# Altium PCB PCB_BDD.PcbDoc (part 1 of 2)
Units mm, origin at the board's own origin, x right, y up, seen from the top; angles counter-clockwise.
Board outline 40 x 35 mm, 2 copper layers (Top Layer, Bottom Layer); 30 components, 19 nets, 78 pads, 51 vias.
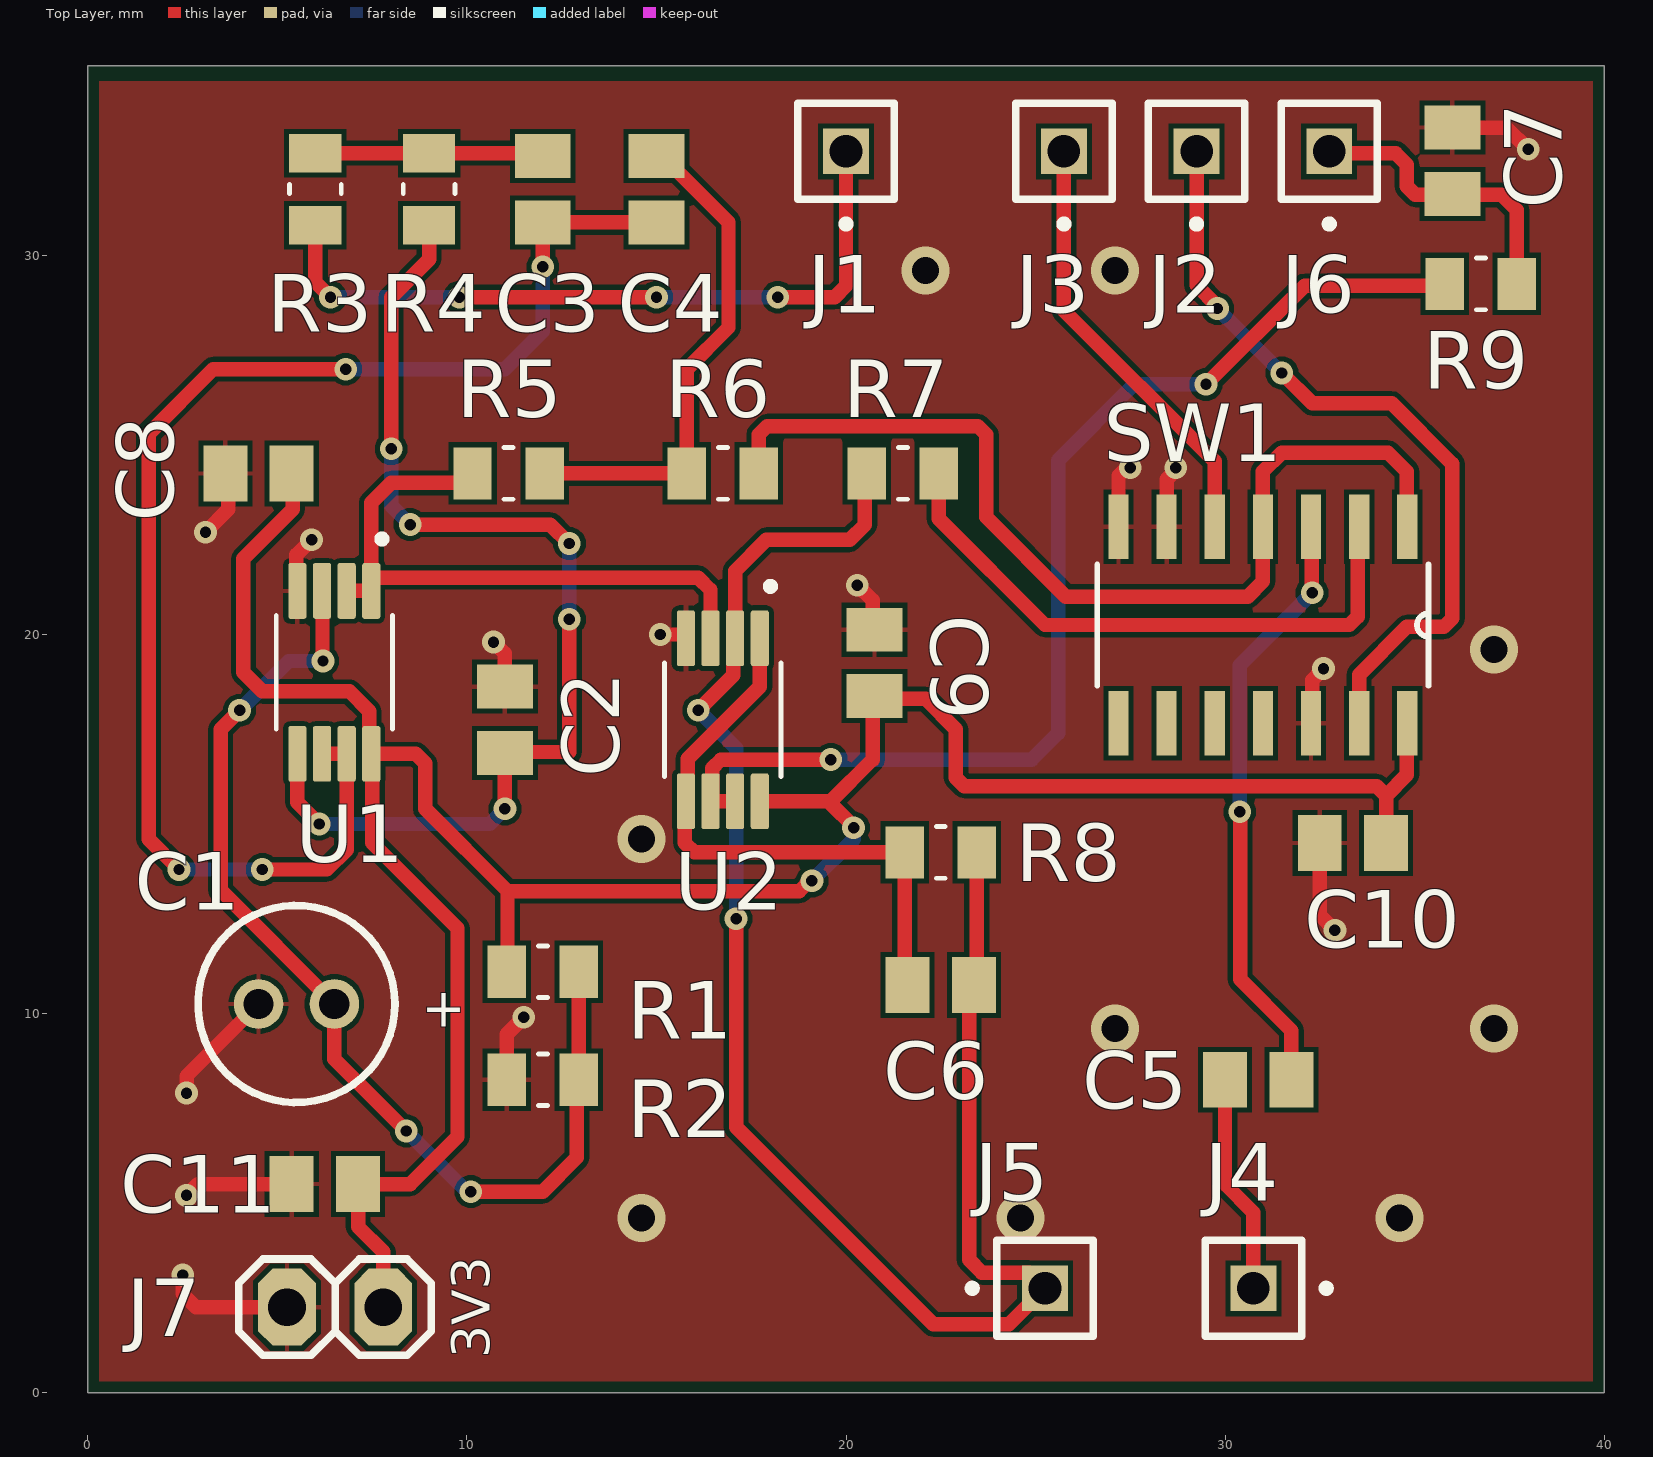
[diagram p0: Top Layer view]
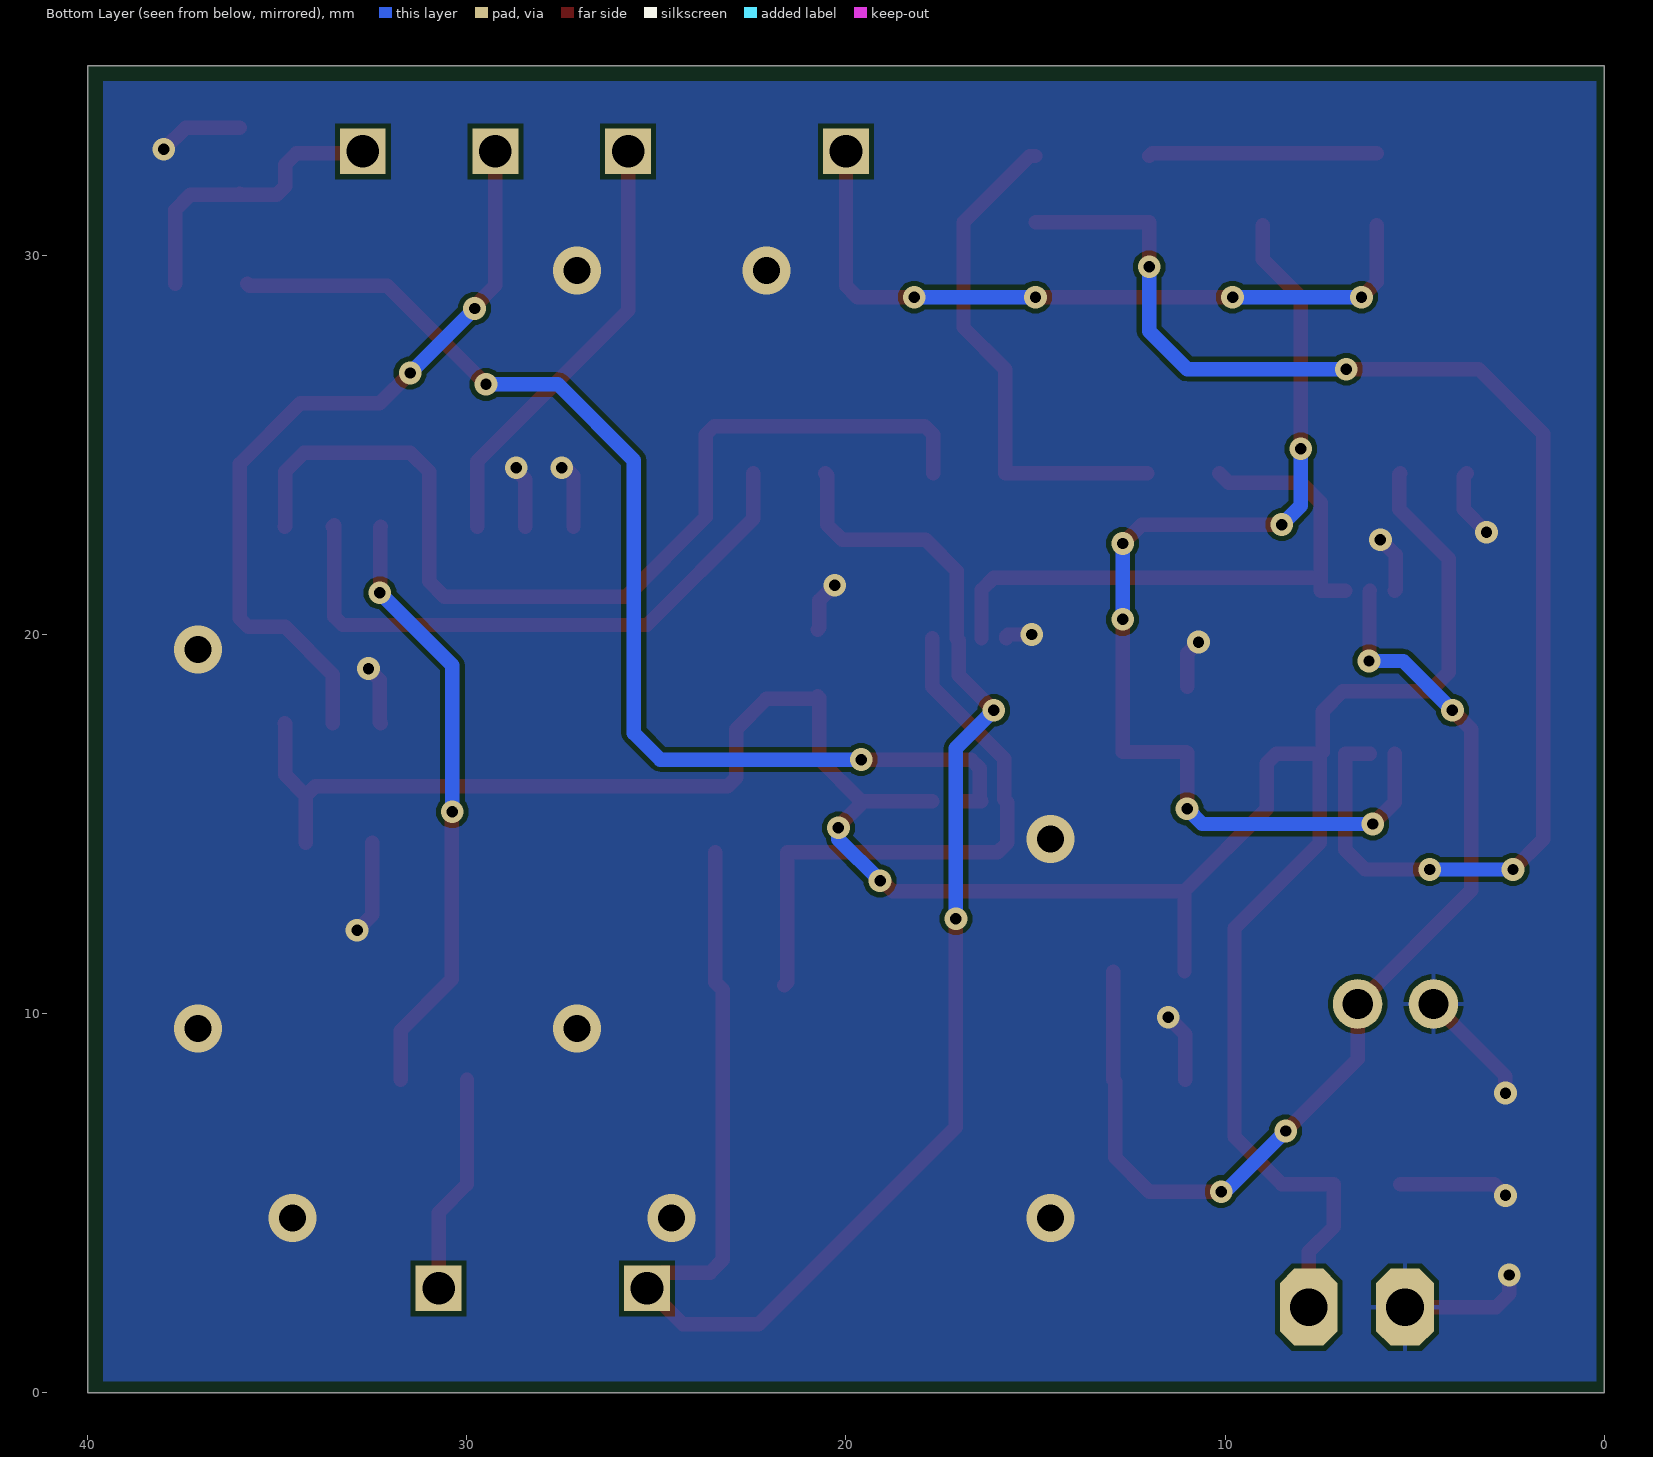
[diagram p1: Bottom Layer view, seen from below]
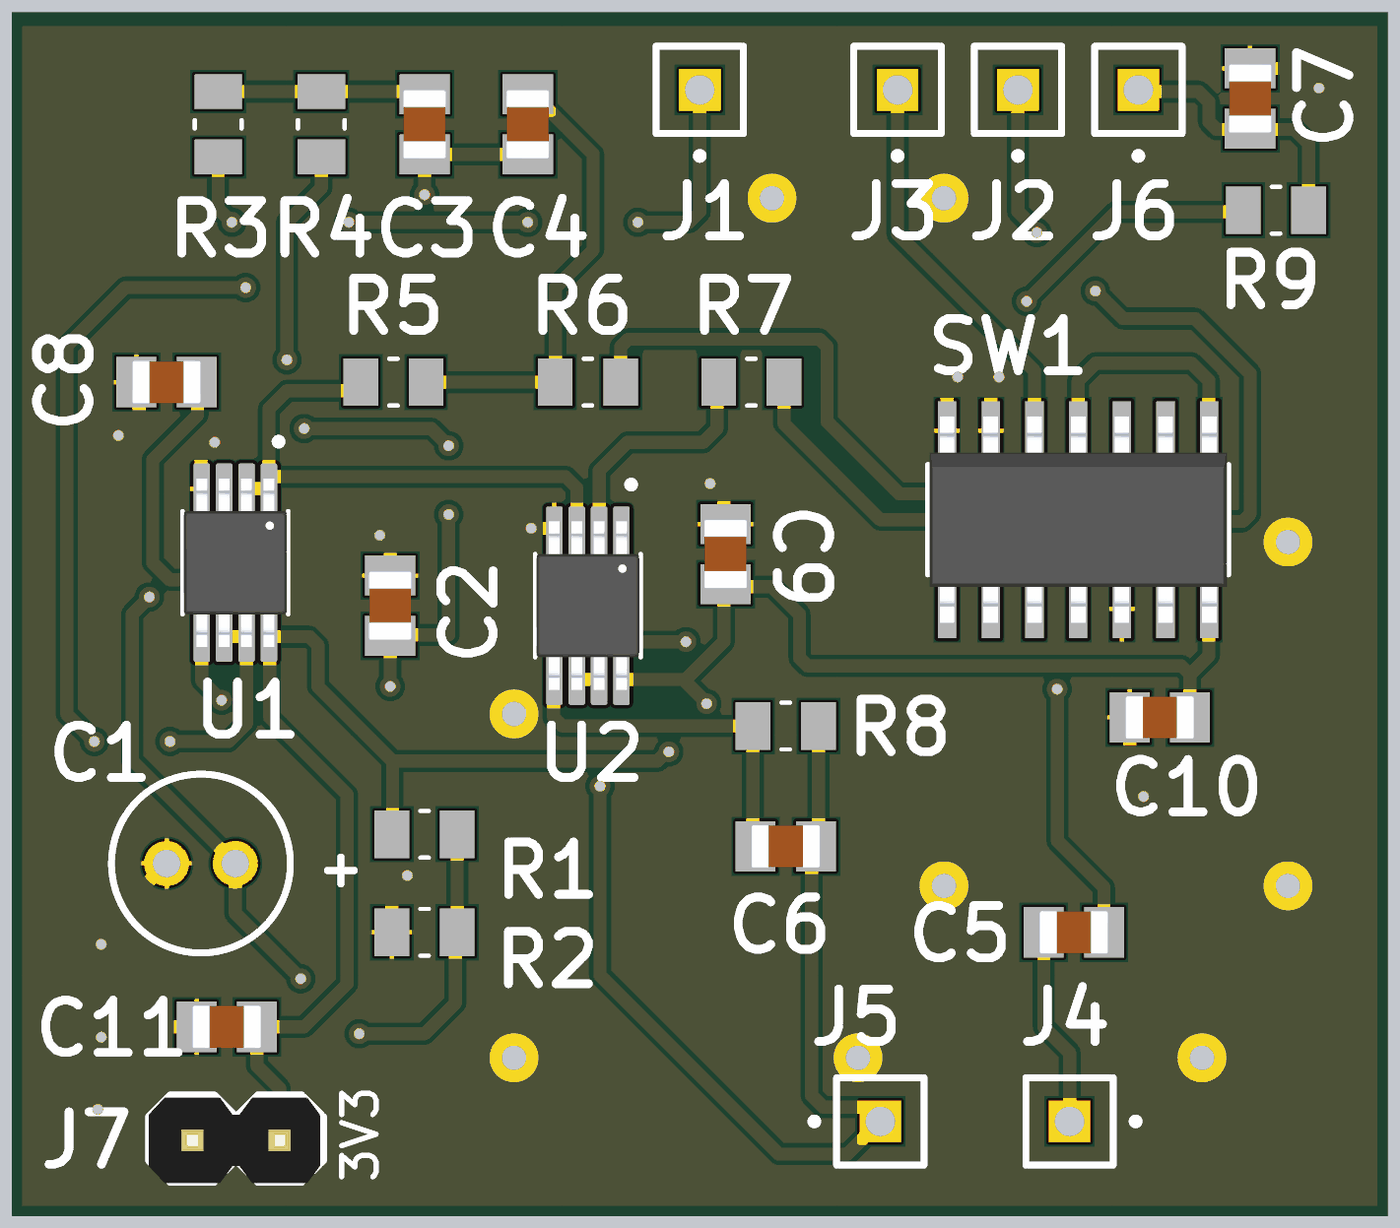
[diagram p2: 3D render of the assembled board from above, using the file's embedded part models]

## Layer stack, top to bottom
Top Solder: solder mask 0.0102, Solder Resist, Dk 3.5
Top Layer: signal copper 0.0356
Dielectric 1: dielectric 0.32, FR-4, Dk 4.8
Bottom Layer: signal copper 0.0356
Bottom Solder: solder mask 0.0102, Solder Resist, Dk 3.5

## Board outline
0,0 0,35 40,35 40,0

## Design rules (kind name [scope] priority, off if disabled: settings)
BoardOutlineClearance [All] p1: gap=0.2 ignorepadtopadclearanceinfootprint=FALSE
Clearance [All] p1: gap=0.127 ignorepadtopadclearanceinfootprint=FALSE except(0.25: Arc-Hole Track-Hole SMDPad-Hole THPad-Hole Via-Hole Fill-Hole Poly-Hole Region-Hole Text-Hole)
ComponentClearance [All] p1: gap=0.127 collisioncheckmode=3 verticalgap=0.127 showdistances=TRUE
DiffPairsRouting [All] p1: maxlimit=0.254 minlimit=0.127 mostfreqgap=0.127 toplayer_minwidth=0.127 toplayer_maxwidth=25.4 toplayer_prefwidth=0.127 bottomlayer_minwidth=0.127 bottomlayer_maxwidth=25.4 bottomlayer_prefwidth=0.127 maxuncoupledlength=12.7
Height [All] p1: minheight=0 maxheight=1816.048 prefheight=12.7
HoleSize [All] p1: absolutevalues=TRUE maxlimit=6.3 minlimit=0.3 maxpercent=80.000 minpercent=20.000
HoleToHoleClearance [All] p1: gap=0.25 allowstackedmicrovias=FALSE
MinimumAnnularRing [All] p1: minimumring=0.076
MinimumSolderMaskSliver [All] p1: minsoldermaskwidth=0
PlaneClearance [All] p1: clearance=0.127
PlaneConnect PlaneConnectPowerPads [InPadClass('PowerPads')] p1: planeconnectstyle=Direct reliefexpansion=0.508 reliefentries=4 reliefconductorwidth=0.254 reliefairgap=0.254
PlaneConnect [All] p2: pad.planeconnectstyle=Relief pad.reliefexpansion=0.3 pad.reliefentries=4 pad.reliefconductorwidth=0.127 pad.reliefairgap=0.127 via.planeconnectstyle=Direct via.reliefexpansion=0.3 via.reliefentries=4 via.reliefconductorwidth=0.127 via.reliefairgap=0.127
PolygonConnect PolygonConnectPowerPads [All vs (InPadClass('PowerPads'))] p1: connectstyle=Direct reliefconductorwidth=0.254 reliefentries=4 polygonreliefangle="90 Angle" airgapwidth=0.254
PolygonConnect [All] p2: thpad.connectstyle=Relief thpad.reliefconductorwidth=0.127 thpad.reliefentries=4 thpad.polygonreliefangle="90 Angle" thpad.airgapwidth=0.127 smdpad.connectstyle=Relief smdpad.reliefconductorwidth=0.127 smdpad.reliefentries=4 smdpad.polygonreliefangle="90 Angle" smdpad.airgapwidth=0.127 via.connectstyle=Direct via.reliefconductorwidth=0.127 via.reliefentries=4 via.polygonreliefangle="90 Angle" via.airgapwidth=0.127
RoutingVias [All] p1: holewidth=0.3 width=0.6 viastyle="Through Hole" minholewidth=0.3 minwidth=0.6 maxholewidth=0.6 maxwidth=6.6
SilkToSilkClearance [All] p1: silktosilkclearance=0
SilkToSolderMaskClearance [IsPad] p1: minsilkscreentomaskgap=0.127 clearancetoexposedcopper=TRUE
SolderMaskExpansion [All] p1: expansion=0.075 istentingtop=FALSE
Width [All] p1: maxlimit=25.4 minlimit=0.127 preferedwidth=0.127 minimp=50.000000 maximp=50.000000 favimp=50.000000
20 further rules are at their usual default settings.

## Components (designator, comment, footprint, x,y, rotation, side; value= is the part's Value field where it differs from the comment)
C1 "1uF" WCAP-ATG5_5X11(DXL) 5.5,10.25 r0 top value=1µF
C2 "1nF" CAPC2012X140N 11,17.75 r270 top
C3 "2.2nF" CAPC2012X88N 12,31.75 r90 top
C4 "0.47uF" CAPC2012X140N 15,31.75 r90 top value=470nF
C5 "1uF" CAPC2012X140N 30.875,8.25 r180 top
C6 "470pF" CAPC2012X88N 22.5,10.75 r180 top
C7 "470pF" CAPC2012X88N 36,32.5 r270 top
C8 "100nF" CAPC2012X140N 4.5,24.25 r0 top
C9 "100nF" CAPC2012X140N 20.75,19.25 r270 top
C10 "100nF" CAPC2012X140N 33.375,14.5 r180 top
C11 "10uF" CAPC2012X140N 6.25,5.5 r0 top value=10µF
J1 "GPIO25_DAC" SAMTEC_SLW-101-01-T-S 20,32.75 r270 top
J2 "GPIO16" SAMTEC_SLW-101-01-T-S 29.25,32.75 r270 top
J3 "GPIO17" SAMTEC_SLW-101-01-T-S 25.75,32.75 r270 top
J4 "ELECTRODE" SAMTEC_SLW-101-01-T-S 30.75,2.75 r0 top
J5 "ELECTRODE" SAMTEC_SLW-101-01-T-S 25.25,2.75 r180 top
J6 "ESP32_ADC1" SAMTEC_SLW-101-01-T-S 32.75,32.75 r270 top
J7 "PPPC021LFBN-RC" My_1X02 7.79,2.25 r0 top
R1 "100K" RESC2012X65N 12,11.1 r180 top value=10kΩ
R2 "100K" RESC2012X65N 12,8.25 r0 top value=10kΩ
R3 "10K" RESC2012X65N 6,31.75 r270 top value=10kΩ
R4 "10K" RESC2012X65N 9,31.75 r90 top value=10kΩ
R5 "100K" RESC2012X65N 11.098,24.25 r0 top value=10kΩ
R6 "100K" RESC2012X65N 16.75,24.25 r180 top value=10kΩ
R7 "10K" RESC2012X65N 21.5,24.25 r180 top
R8 "100K" RESC2012X65N 22.5,14.25 r180 top
R9 "150R" RESC2012X65N 36.75,29.25 r0 top
SW1 "74HC4066D-Q100,118" SOIC127P600X175-14N 31,20.25 r270 top
U1 "OPA2333AIDGKR" SOP65P490X110-8N 6.5,19 r270 top
U2 "OPA2333AIDGKR" SOP65P490X110-8N 16.75,17.75 r270 top

## Footprints (in the part's own frame and the unit in brackets; to place one, negate y for a bottom-side part, rotate by r counter-clockwise, add the part's x,y. Pads: shape width x height; smd on the part's side, far side on the other; paste and mask are expansions set on the pad)
CAPC2012X88N [mm]
  rect 1.16x1.47 smd: 1(-0.875,0) 2(0.875,0)
  body extent -1,-0.63 1,0.63, height 0.88
CAPC2012X140N [mm]
  rect 1.16x1.47 smd: 1(-0.875,0) 2(0.875,0)
  body extent -1,-0.63 1,0.63, height 0.88
My_1X02 [mil]
  oct 60x80 hole 39.37: 1(-100,0) 2(0,0)
  silkscreen extent -150,-50 50,50, body extent -150,-51 46,47, height 323
RESC2012X65N [mm]
  rect 1.01x1.38 smd: 1(-0.95,0) 2(0.95,0)
  silkscreen extent -0.12,-0.68 0.12,0.68
SAMTEC_SLW-101-01-T-S [mm]
  rect 1.21x1.21 hole 0.86: 01(0,0)
  silkscreen extent -1.27,-1.27 2.02,1.27
SOIC127P600X175-14N [mil]
  rect 67x21 smd paste+0 mask+4.02: 1(-102,150) 2(-102,100) 3(-102,50) 4(-102,0) 5(-102,-50) 6(-102,-100) 7(-102,-150) 8(102,-150) 9(102,-100) 10(102,-50) 11(102,0) 12(102,50) 13(102,100) 14(102,150)
  silkscreen extent -63,-172 63,172, body extent -118,-170 118,170, height 69
SOP65P490X110-8N [mm]
  rrect25% 1.47x0.48 smd paste+0 mask+0.102: 1(-2.15,0.975) 2(-2.15,0.325) 3(-2.15,-0.325) 4(-2.15,-0.975) 5(2.15,-0.975) 6(2.15,-0.325) 7(2.15,0.325) 8(2.15,0.975)
  silkscreen extent -3.62,-1.54 1.5,1.53, body extent -2.45,-1.5 2.45,1.5, height 1.1
WCAP-ATG5_5X11(DXL) [mm]
  round 1.308 hole 0.8: 1(1,0) 2(-1,0)
  silkscreen extent -2.6,-2.6 2.6,2.6

## Part data
C1: library part 860020672005, "CAP ALUM 1UF 20% 50V RADIAL TH", Case/Package=Radial, ESR (Equivalent Series Resistance)=39.553Ω, Leakage Current=3µA, Manufacturer="Wurth Elektronik", Manufacturer Lifecycle Status=ACTIVE, Max Operating Temperature=105°C, Min Operating Temperature=-40°C, Ripple Current=13mA, Supplier Part Number=732-8851-3-ND, Tolerance=20%, Voltage Rating=50V, Category="Aluminum Electrolytic Capacitors", ComponentLink1Description=https://datasheet.octopart.com:443/860020672005-Wurth-Elektronik-datasheet-159617218.pdf?src-supplier=Wurth+Elektronik, ComponentLink1URL=https://datasheet.octopart.com:443/860020672005-Wurth-Elektronik-datasheet-159617218.pdf?src-supplier=Wurth+Elektronik, ComponentLink2Description=https://datasheet.octopart.com:443/860020672005-W%C3%BCrth-Elektronik-datasheet-37143900.pdf?src-supplier=RS+(Formerly+Allied+Electronics), ComponentLink2URL=https://datasheet.octopart.com:443/860020672005-W%C3%BCrth-Elektronik-datasheet-37143900.pdf?src-supplier=RS+(Formerly+Allied+Electronics), Diameter=5mm, Height=11mm, Height - Seated (Max)=12.4968mm, Hole Diameter=800µm, Lead Pitch=2.0066mm, Length=11mm, Life (Hours)=2000hours, Lifecycle Status=Production, Manufacturer Part Number=860020672005, Mounting Technology="Through Hole", Packaging="Tape & Box (TB)", Pitch=2mm, Polarity=Polar, Pricing="2000=0.0551 (USD)", REACH SVHC=Unknown, RoHS=Compliant, Stock=70000, Supplier=DigiKey, Voltage Rating (DC)=50V, YEOL="1 = Estimated lifetime > 10 years"
C2: library part C0805C102K5RACTU, "CAP CER 1000PF 50V X7R 0805", Case Code (Imperial)=0805, Dielectric=X7R, Dielectric Material=Ceramic, Manufacturer="Yageo Group", Max Operating Temperature=125°C, Min Operating Temperature=-55°C, Supplier Part Number=399-C0805C102K5RACTUCT-ND, Temperature Coefficient=30ppm/°C, Tolerance=10%, Voltage=50V, Case/Package=0805, Category="Ceramic Capacitors", China RoHS=Compliant, ComponentLink1Description=https://datasheet.octopart.com:443/C0805C102K5RAC7800-KEMET-datasheet-179100141.pdf?src-supplier=IHS, ComponentLink1URL=https://datasheet.octopart.com:443/C0805C102K5RAC7800-KEMET-datasheet-179100141.pdf?src-supplier=IHS, ComponentLink2Description=https://datasheet.octopart.com:443/C0805C102K5RACTU-KEMET-datasheet-178445679.pdf?src-supplier=IHS, ComponentLink2URL=https://datasheet.octopart.com:443/C0805C102K5RACTU-KEMET-datasheet-178445679.pdf?src-supplier=IHS, ComponentLink3Description=https://datasheet.octopart.com:443/C0805C102K5RACTU-KEMET-datasheet-137357759.pdf?src-supplier=Farnell, ComponentLink3URL=https://datasheet.octopart.com:443/C0805C102K5RACTU-KEMET-datasheet-137357759.pdf?src-supplier=Farnell, ComponentLink4Description=https://datasheet.octopart.com:443/C0805C102K5RACTU-KEMET-datasheet-32036385.pdf?src-supplier=Farnell, ComponentLink4URL=https://datasheet.octopart.com:443/C0805C102K5RACTU-KEMET-datasheet-32036385.pdf?src-supplier=Farnell, ComponentLink5Description=https://datasheet.octopart.com:443/C0805C102K5RACTU-Kemet-datasheet-12608295.pdf?src-supplier=Farnell, ComponentLink5URL=https://datasheet.octopart.com:443/C0805C102K5RACTU-Kemet-datasheet-12608295.pdf?src-supplier=Farnell, ComponentLink6Description=https://datasheet.octopart.com:443/C0805C102K5RACTU-Kemet-datasheet-11992184.pdf?src-supplier=Farnell, ComponentLink6URL=https://datasheet.octopart.com:443/C0805C102K5RACTU-Kemet-datasheet-11992184.pdf?src-supplier=Farnell, ComponentLink7Description=https://datasheet.octopart.com:443/C0805C102K5RACTU-Kemet-datasheet-10942409.pdf?src-supplier=Farnell, ComponentLink7URL=https://datasheet.octopart.com:443/C0805C102K5RACTU-Kemet-datasheet-10942409.pdf?src-supplier=Farnell, ComponentLink8Description=https://datasheet.octopart.com:443/C0805C102K5RACTU-Kemet-datasheet-10404442.pdf?src-supplier=Farnell, ComponentLink8URL=https://datasheet.octopart.com:443/C0805C102K5RACTU-Kemet-datasheet-10404442.pdf?src-supplier=Farnell, ComponentLink9Description=https://datasheet.octopart.com:443/C0805C102K5RACTU-KEMET-datasheet-101576065.pdf?src-supplier=Farnell, ComponentLink9URL=https://datasheet.octopart.com:443/C0805C102K5RACTU-KEMET-datasheet-101576065.pdf?src-supplier=Farnell, ComponentLink10Description=https://datasheet.octopart.com:443/C0805C102K5RACTU.-Kemet-datasheet-41232427.pdf?src-supplier=Farnell, ComponentLink10URL=https://datasheet.octopart.com:443/C0805C102K5RACTU.-Kemet-datasheet-41232427.pdf?src-supplier=Farnell, ComponentLink11Description=https://datasheet.octopart.com:443/C0805C102K5RACTU-KEMET-datasheet-176142286.pdf?src-supplier=Farnell, ComponentLink11URL=https://datasheet.octopart.com:443/C0805C102K5RACTU-KEMET-datasheet-176142286.pdf?src-supplier=Farnell, ComponentLink12Description=https://datasheet.octopart.com:443/C0805C102K5RAC-TU-Kemet-datasheet-7833651.pdf?src-supplier=Farnell, ComponentLink12URL=https://datasheet.octopart.com:443/C0805C102K5RAC-TU-Kemet-datasheet-7833651.pdf?src-supplier=Farnell, ComponentLink13Description=https://datasheet.octopart.com:443/C0805C102K5RAC-TU-Kemet-datasheet-7601896.pdf?src-supplier=Farnell, ComponentLink13URL=https://datasheet.octopart.com:443/C0805C102K5RAC-TU-Kemet-datasheet-7601896.pdf?src-supplier=Farnell, ComponentLink14Description=https://datasheet.octopart.com:443/C0805C102K5RAC-TU-Kemet-datasheet-5316294.pdf?src-supplier=Farnell, ComponentLink14URL=https://datasheet.octopart.com:443/C0805C102K5RAC-TU-Kemet-datasheet-5316294.pdf?src-supplier=Farnell, ComponentLink15Description=https://datasheet.octopart.com:443/C0805C102K5RAC-TU-Kemet-datasheet-5314837.pdf?src-supplier=Farnell, ComponentLink15URL=https://datasheet.octopart.com:443/C0805C102K5RAC-TU-Kemet-datasheet-5314837.pdf?src-supplier=Farnell, ComponentLink16Description=https://datasheet.octopart.com:443/C0805C102K5RAC-TU-Kemet-datasheet-8092359.pdf?src-supplier=Farnell, ComponentLink16URL=https://datasheet.octopart.com:443/C0805C102K5RAC-TU-Kemet-datasheet-8092359.pdf?src-supplier=Farnell, ComponentLink17Description=https://datasheet.octopart.com:443/C0805C102K5RACTU-Kemet-datasheet-5314449.pdf?src-supplier=Farnell, ComponentLink17URL=https://datasheet.octopart.com:443/C0805C102K5RACTU-Kemet-datasheet-5314449.pdf?src-supplier=Farnell, ComponentLink18Description=https://datasheet.octopart.com:443/C0805C102K5RAC-TU-Kemet-datasheet-5314969.pdf?src-supplier=Farnell, ComponentLink18URL=https://datasheet.octopart.com:443/C0805C102K5RAC-TU-Kemet-datasheet-5314969.pdf?src-supplier=Farnell, ComponentLink19Description=https://datasheet.octopart.com:443/C0805C102K5RAC-TU-Kemet-datasheet-5314627.pdf?src-supplier=Farnell, ComponentLink19URL=https://datasheet.octopart.com:443/C0805C102K5RAC-TU-Kemet-datasheet-5314627.pdf?src-supplier=Farnell, ComponentLink20Description=https://datasheet.octopart.com:443/C0805C102K5RAC-TU-Kemet-datasheet-5389132.pdf?src-supplier=Farnell, ComponentLink20URL=https://datasheet.octopart.com:443/C0805C102K5RAC-TU-Kemet-datasheet-5389132.pdf?src-supplier=Farnell, ComponentLink21Description=https://datasheet.octopart.com:443/C0805C102K5RAC-TU-Kemet-datasheet-5313836.pdf?src-supplier=Farnell, ComponentLink21URL=https://datasheet.octopart.com:443/C0805C102K5RAC-TU-Kemet-datasheet-5313836.pdf?src-supplier=Farnell, ComponentLink22Description=https://datasheet.octopart.com:443/C0805C102K5RAC-TU-Kemet-datasheet-8111010.pdf?src-supplier=Farnell, ComponentLink22URL=https://datasheet.octopart.com:443/C0805C102K5RAC-TU-Kemet-datasheet-8111010.pdf?src-supplier=Farnell, ComponentLink23Description=https://datasheet.octopart.com:443/C0805C102K5RAC-TU-Kemet-datasheet-7627733.pdf?src-supplier=Farnell, ComponentLink23URL=https://datasheet.octopart.com:443/C0805C102K5RAC-TU-Kemet-datasheet-7627733.pdf?src-supplier=Farnell, ComponentLink24Description=https://datasheet.octopart.com:443/C0805C102K5RAC-TU-Kemet-datasheet-5315946.pdf?src-supplier=Farnell, ComponentLink24URL=https://datasheet.octopart.com:443/C0805C102K5RAC-TU-Kemet-datasheet-5315946.pdf?src-supplier=Farnell, ComponentLink25Description=https://datasheet.octopart.com:443/C0805C102K5RACTU-KEMET-datasheet-68331921.pdf?src-supplier=Upverter, ComponentLink25URL=https://datasheet.octopart.com:443/C0805C102K5RACTU-KEMET-datasheet-68331921.pdf?src-supplier=Upverter, ComponentLink26Description=https://datasheet.octopart.com:443/C0805C102K5RAC-TU-Kemet-datasheet-5313890.pdf?src-supplier=Newark, ComponentLink26URL=https://datasheet.octopart.com:443/C0805C102K5RAC-TU-Kemet-datasheet-5313890.pdf?src-supplier=Newark, ComponentLink27Description=https://datasheet.octopart.com:443/C0805C102K5RACTU-KEMET-datasheet-130256537.pdf?src-supplier=Newark, ComponentLink27URL=https://datasheet.octopart.com:443/C0805C102K5RACTU-KEMET-datasheet-130256537.pdf?src-supplier=Newark, ComponentLink28Description=https://datasheet.octopart.com:443/C0805C102K5RAC-TU-Kemet-datasheet-5390537.pdf?src-supplier=Newark, ComponentLink28URL=https://datasheet.octopart.com:443/C0805C102K5RAC-TU-Kemet-datasheet-5390537.pdf?src-supplier=Newark, ComponentLink29Description=https://datasheet.octopart.com:443/C0805C102K5RAC-TU-Kemet-datasheet-7541751.pdf?src-supplier=Newark, ComponentLink29URL=https://datasheet.octopart.com:443/C0805C102K5RAC-TU-Kemet-datasheet-7541751.pdf?src-supplier=Newark, ComponentLink30Description=https://datasheet.octopart.com:443/C0805C102K5RACTU-KEMET-datasheet-176289583.pdf?src-supplier=Newark, ComponentLink30URL=https://datasheet.octopart.com:443/C0805C102K5RACTU-KEMET-datasheet-176289583.pdf?src-supplier=Newark, ComponentLink31Description=https://datasheet.octopart.com:443/C0805C102K5RACTU-Kemet-datasheet-8764837.pdf?src-supplier=Newark, ComponentLink31URL=https://datasheet.octopart.com:443/C0805C102K5RACTU-Kemet-datasheet-8764837.pdf?src-supplier=Newark, ComponentLink32Description=https://datasheet.octopart.com:443/C0805C102K5RACTU-Kemet-datasheet-8480123.pdf?src-supplier=Newark, ComponentLink32URL=https://datasheet.octopart.com:443/C0805C102K5RACTU-Kemet-datasheet-8480123.pdf?src-supplier=Newark, ComponentLink33Description=https://datasheet.octopart.com:443/C0805C102K5RACTU-Kemet-datasheet-5393970.pdf?src-supplier=Newark, ComponentLink33URL=https://datasheet.octopart.com:443/C0805C102K5RACTU-Kemet-datasheet-5393970.pdf?src-supplier=Newark, ComponentLink34Description=https://datasheet.octopart.com:443/C0805C102K5RACTU-Kemet-datasheet-8502025.pdf?src-supplier=Newark, ComponentLink34URL=https://datasheet.octopart.com:443/C0805C102K5RACTU-Kemet-datasheet-8502025.pdf?src-supplier=Newark, ComponentLink35Description=https://datasheet.octopart.com:443/C0805C102K5RACTU-Kemet-datasheet-161801.pdf?src-supplier=Newark, ComponentLink35URL=https://datasheet.octopart.com:443/C0805C102K5RACTU-Kemet-datasheet-161801.pdf?src-supplier=Newark, ComponentLink36Description=https://datasheet.octopart.com:443/C0805C102K5RACTU-KEMET-datasheet-184787613.pdf?src-supplier=Newark, ComponentLink36URL=https://datasheet.octopart.com:443/C0805C102K5RACTU-KEMET-datasheet-184787613.pdf?src-supplier=Newark, ComponentLink37Description=https://datasheet.octopart.com:443/C0805C102K5RAC7800-KEMET-datasheet-37550250.pdf?src-supplier=Electro+Sonic, ComponentLink37URL=https://datasheet.octopart.com:443/C0805C102K5RAC7800-KEMET-datasheet-37550250.pdf?src-supplier=Electro+Sonic, ComponentLink38Description=https://datasheet.octopart.com:443/C0805C102K5RAC7800-KEMET-datasheet-188512054.pdf?src-supplier=ODG+(Origin+Data+Global), ComponentLink38URL=https://datasheet.octopart.com:443/C0805C102K5RAC7800-KEMET-datasheet-188512054.pdf?src-supplier=ODG+(Origin+Data+Global), ComponentLink39Description=https://datasheet.octopart.com:443/C0805C102K5RACTU-KEMET-datasheet-164512540.pdf?src-supplier=TME, ComponentLink39URL=https://datasheet.octopart.com:443/C0805C102K5RACTU-KEMET-datasheet-164512540.pdf?src-supplier=TME, ComponentLink40Description=https://datasheet.octopart.com:443/C0805C102K5RACTU-Kemet-datasheet-67847102.pdf?src-supplier=TME, ComponentLink40URL=https://datasheet.octopart.com:443/C0805C102K5RACTU-Kemet-datasheet-67847102.pdf?src-supplier=TME, ComponentLink41Description=https://datasheet.octopart.com:443/C0805C102K5RACTU-KEMET-datasheet-68331906.pdf?src-supplier=TME, ComponentLink41URL=https://datasheet.octopart.com:443/C0805C102K5RACTU-KEMET-datasheet-68331906.pdf?src-supplier=TME, ComponentLink42Description=https://datasheet.octopart.com:443/C0805C102K5RACTU-KEMET-datasheet-110724412.pdf?src-supplier=RS+(Formerly+Allied+Electronics), ComponentLink42URL=https://datasheet.octopart.com:443/C0805C102K5RACTU-KEMET-datasheet-110724412.pdf?src-supplier=RS+(Formerly+Allied+Electronics), ComponentLink43Description=https://datasheet.octopart.com:443/C0805C102K5RACTU-Kemet-datasheet-464.pdf?src-supplier=RS+(Formerly+Allied+Electronics), ComponentLink43URL=https://datasheet.octopart.com:443/C0805C102K5RACTU-Kemet-datasheet-464.pdf?src-supplier=RS+(Formerly+Allied+Electronics), ComponentLink44Description=https://datasheet.octopart.com/C0805C102K5RACTU-KEMET-datasheet-84169754.pdf, ComponentLink44URL=https://datasheet.octopart.com/C0805C102K5RACTU-KEMET-datasheet-84169754.pdf, ComponentLink45Description=https://datasheet.octopart.com:443/C0805C102K5RACTU-Kemet-datasheet-24570007.pdf?src-supplier=element14+APAC, ComponentLink45URL=https://datasheet.octopart.com:443/C0805C102K5RACTU-Kemet-datasheet-24570007.pdf?src-supplier=element14+APAC, ComponentLink46Description=https://datasheet.octopart.com:443/C0805C102K5RACTU-Kemet-datasheet-22084244.pdf?src-supplier=element14+APAC, ComponentLink46URL=https://datasheet.octopart.com:443/C0805C102K5RACTU-Kemet-datasheet-22084244.pdf?src-supplier=element14+APAC, ComponentLink47Description=https://datasheet.octopart.com:443/C0805C102K5RACTU-Kemet-datasheet-11791272.pdf?src-supplier=Arrow+Electronics, ComponentLink47URL=https://datasheet.octopart.com:443/C0805C102K5RACTU-Kemet-datasheet-11791272.pdf?src-supplier=Arrow+Electronics, ComponentLink48Description=https://datasheet.octopart.com:443/C0805C102K5RAC7800-Kemet-datasheet-11546808.pdf?src-supplier=Arrow+Electronics, ComponentLink48URL=https://datasheet.octopart.com:443/C0805C102K5RAC7800-Kemet-datasheet-11546808.pdf?src-supplier=Arrow+Electronics, ComponentLink49Description=https://datasheet.octopart.com:443/C0805C102K5RAC7800-KEMET-datasheet-164857143.pdf?src-supplier=Burklin+Elektronik, ComponentLink49URL=https://datasheet.octopart.com:443/C0805C102K5RAC7800-KEMET-datasheet-164857143.pdf?src-supplier=Burklin+Elektronik, ComponentLink50Description=https://datasheet.octopart.com:443/C0805C102K5RAC-TU-Kemet-datasheet-7272872.pdf?src-supplier=Jameco+(USA), ComponentLink50URL=https://datasheet.octopart.com:443/C0805C102K5RAC-TU-Kemet-datasheet-7272872.pdf?src-supplier=Jameco+(USA), ComponentLink51Description=http://sigma.octopart.com:80/conflict_mineral_statement/Yageo-company-3.pdf?src-supplier=Compliance+Statements, ComponentLink51URL=http://sigma.octopart.com:80/conflict_mineral_statement/Yageo-company-3.pdf?src-supplier=Compliance+Statements, ComponentLink52Description=http://sigma.octopart.com:80/rohs_statement/Yageo-company-2.pdf?src-supplier=Compliance+Statements, ComponentLink52URL=http://sigma.octopart.com:80/rohs_statement/Yageo-company-2.pdf?src-supplier=Compliance+Statements, Contact Plating=Tin, Country of Origin=Mexico, Depth=1.25mm, Export Control Classification Number (ECCN) Code=EAR99, Harmonized Tariff Schedule (HTS) Code=8532.24.00.20, Height=780µm, Introduction Date=2008-01-10, Lead Free="Lead Free", Lead Pitch=750µm, Length=2mm, Lifecycle Status=Production, Manufacturer Part Number=C0805C102K5RACTU, Material=Ceramic, Mounting Technology="Surface Mount", Number of Terminals=2, Packaging="Cut Tape", Pins=2, Pricing="1=0.16, 10=0.088, 50=0.0612, 100=0.0529, 500=0.03924 (USD)", Radiation Hardening=No, REACH SVHC=Unaffected, RoHS=Compliant, Schedule B="8532240020, 8532240020|8532240020, 8532240020|8532240020|8532240020, 8532240020|8532240020|8532240020|8532240020", Stock=586001, Supplier=DigiKey, Termination=SMD/SMT, Thickness=889µm, Voltage Rating=50V, Voltage Rating (DC)=50V, Width=1.25mm
C3: library part C0805C222K5RACTU, "CAP CER 2200PF 50V X7R 0805", Case Code (Imperial)=0805, Dielectric=X7R, Dielectric Material=Ceramic, Manufacturer="Yageo Group", Manufacturer Package Identifier="0805 (2012 metric)", Max Operating Temperature=125°C, Min Operating Temperature=-55°C, Supplier Part Number=399-C0805C222K5RACTUCT-ND, Temperature Coefficient=30ppm/°C, Tolerance=10%, Voltage=50V, Case/Package=0805, Category="Ceramic Capacitors", China RoHS=Compliant, ComponentLink1Description=https://datasheet.octopart.com:443/C0805C222K5RACTU-KEMET-datasheet-178445679.pdf?src-supplier=Farnell, ComponentLink1URL=https://datasheet.octopart.com:443/C0805C222K5RACTU-KEMET-datasheet-178445679.pdf?src-supplier=Farnell, ComponentLink2Description=https://datasheet.octopart.com:443/C0805C222K5RACTU-KEMET-datasheet-137357759.pdf?src-supplier=Farnell, ComponentLink2URL=https://datasheet.octopart.com:443/C0805C222K5RACTU-KEMET-datasheet-137357759.pdf?src-supplier=Farnell, ComponentLink3Description=https://datasheet.octopart.com:443/C0805C222K5RACTU-Kemet-datasheet-5313890.pdf?src-supplier=Farnell, ComponentLink3URL=https://datasheet.octopart.com:443/C0805C222K5RACTU-Kemet-datasheet-5313890.pdf?src-supplier=Farnell, ComponentLink4Description=https://datasheet.octopart.com:443/C0805C222K5RACTU-Kemet-datasheet-8764837.pdf?src-supplier=Farnell, ComponentLink4URL=https://datasheet.octopart.com:443/C0805C222K5RACTU-Kemet-datasheet-8764837.pdf?src-supplier=Farnell, ComponentLink5Description=https://datasheet.octopart.com:443/C0805C222K5RACTU-Kemet-datasheet-8480123.pdf?src-supplier=Farnell, ComponentLink5URL=https://datasheet.octopart.com:443/C0805C222K5RACTU-Kemet-datasheet-8480123.pdf?src-supplier=Farnell, ComponentLink6Description=https://datasheet.octopart.com:443/C0805C222K5RACTU-Kemet-datasheet-5390537.pdf?src-supplier=Farnell, ComponentLink6URL=https://datasheet.octopart.com:443/C0805C222K5RACTU-Kemet-datasheet-5390537.pdf?src-supplier=Farnell, ComponentLink7Description=https://datasheet.octopart.com:443/C0805C222K5RACTU-Kemet-datasheet-5393970.pdf?src-supplier=Farnell, ComponentLink7URL=https://datasheet.octopart.com:443/C0805C222K5RACTU-Kemet-datasheet-5393970.pdf?src-supplier=Farnell, ComponentLink8Description=https://datasheet.octopart.com:443/C0805C222K5RACTU-Kemet-datasheet-8502025.pdf?src-supplier=Farnell, ComponentLink8URL=https://datasheet.octopart.com:443/C0805C222K5RACTU-Kemet-datasheet-8502025.pdf?src-supplier=Farnell, ComponentLink9Description=https://datasheet.octopart.com:443/C0805C222K5RACTU-Kemet-datasheet-7541751.pdf?src-supplier=Farnell, ComponentLink9URL=https://datasheet.octopart.com:443/C0805C222K5RACTU-Kemet-datasheet-7541751.pdf?src-supplier=Farnell, ComponentLink10Description=https://datasheet.octopart.com:443/C0805C222K5RACTU-Kemet-datasheet-161801.pdf?src-supplier=Farnell, ComponentLink10URL=https://datasheet.octopart.com:443/C0805C222K5RACTU-Kemet-datasheet-161801.pdf?src-supplier=Farnell, ComponentLink11Description=https://datasheet.octopart.com:443/C0805C222K5RACTU-KEMET-datasheet-101576227.pdf?src-supplier=Farnell, ComponentLink11URL=https://datasheet.octopart.com:443/C0805C222K5RACTU-KEMET-datasheet-101576227.pdf?src-supplier=Farnell, ComponentLink12Description=https://datasheet.octopart.com:443/C0805C222K5RACTU.-Kemet-datasheet-41232427.pdf?src-supplier=Farnell, ComponentLink12URL=https://datasheet.octopart.com:443/C0805C222K5RACTU.-Kemet-datasheet-41232427.pdf?src-supplier=Farnell, ComponentLink13Description=https://datasheet.octopart.com:443/C0805C222K5RACTU-KEMET-datasheet-176142323.pdf?src-supplier=Farnell, ComponentLink13URL=https://datasheet.octopart.com:443/C0805C222K5RACTU-KEMET-datasheet-176142323.pdf?src-supplier=Farnell, ComponentLink14Description=https://datasheet.octopart.com:443/C0805C222K5RACTU-Kemet-datasheet-12608295.pdf?src-supplier=Farnell, ComponentLink14URL=https://datasheet.octopart.com:443/C0805C222K5RACTU-Kemet-datasheet-12608295.pdf?src-supplier=Farnell, ComponentLink15Description=https://datasheet.octopart.com:443/C0805C222K5RACTU-Kemet-datasheet-11992184.pdf?src-supplier=Farnell, ComponentLink15URL=https://datasheet.octopart.com:443/C0805C222K5RACTU-Kemet-datasheet-11992184.pdf?src-supplier=Farnell, ComponentLink16Description=https://datasheet.octopart.com:443/C0805C222K5RACTU-Kemet-datasheet-10942409.pdf?src-supplier=Farnell, ComponentLink16URL=https://datasheet.octopart.com:443/C0805C222K5RACTU-Kemet-datasheet-10942409.pdf?src-supplier=Farnell, ComponentLink17Description=https://datasheet.octopart.com:443/C0805C222K5RACTU-Kemet-datasheet-10404442.pdf?src-supplier=Farnell, ComponentLink17URL=https://datasheet.octopart.com:443/C0805C222K5RACTU-Kemet-datasheet-10404442.pdf?src-supplier=Farnell, ComponentLink18Description=https://datasheet.octopart.com:443/C0805C222K5RACTU-Kemet-datasheet-500041.pdf?src-supplier=Farnell, ComponentLink18URL=https://datasheet.octopart.com:443/C0805C222K5RACTU-Kemet-datasheet-500041.pdf?src-supplier=Farnell, ComponentLink19Description=https://datasheet.octopart.com:443/C0805C222K5RACTU-KEMET-datasheet-182041860.pdf?src-supplier=IHS, ComponentLink19URL=https://datasheet.octopart.com:443/C0805C222K5RACTU-KEMET-datasheet-182041860.pdf?src-supplier=IHS, ComponentLink20Description=https://datasheet.octopart.com:443/C0805C222K5RACTU-KEMET-datasheet-68331921.pdf?src-supplier=Upverter, ComponentLink20URL=https://datasheet.octopart.com:443/C0805C222K5RACTU-KEMET-datasheet-68331921.pdf?src-supplier=Upverter, ComponentLink21Description=https://datasheet.octopart.com:443/C0805C222K5RACTU-KEMET-datasheet-130256537.pdf?src-supplier=Newark, ComponentLink21URL=https://datasheet.octopart.com:443/C0805C222K5RACTU-KEMET-datasheet-130256537.pdf?src-supplier=Newark, ComponentLink22Description=https://datasheet.octopart.com:443/C0805C222K5RACTU-KEMET-datasheet-170667462.pdf?src-supplier=Newark, ComponentLink22URL=https://datasheet.octopart.com:443/C0805C222K5RACTU-KEMET-datasheet-170667462.pdf?src-supplier=Newark, ComponentLink23Description=https://datasheet.octopart.com:443/C0805C222K5RACTU-Kemet-datasheet-27203261.pdf?src-supplier=Newark, ComponentLink23URL=https://datasheet.octopart.com:443/C0805C222K5RACTU-Kemet-datasheet-27203261.pdf?src-supplier=Newark, ComponentLink24Description=https://datasheet.octopart.com:443/C0805C222K5RACTU-KEMET-datasheet-37550250.pdf?src-supplier=Electro+Sonic, ComponentLink24URL=https://datasheet.octopart.com:443/C0805C222K5RACTU-KEMET-datasheet-37550250.pdf?src-supplier=Electro+Sonic, ComponentLink25Description=https://datasheet.octopart.com:443/C0805C222K5RACTU-KEMET-datasheet-178249621.pdf?src-supplier=Master+Electronics, ComponentLink25URL=https://datasheet.octopart.com:443/C0805C222K5RACTU-KEMET-datasheet-178249621.pdf?src-supplier=Master+Electronics, ComponentLink26Description=https://datasheet.octopart.com:443/C0805C222K5RACTU-KEMET-datasheet-164512540.pdf?src-supplier=TME, ComponentLink26URL=https://datasheet.octopart.com:443/C0805C222K5RACTU-KEMET-datasheet-164512540.pdf?src-supplier=TME, ComponentLink27Description=https://datasheet.octopart.com:443/C0805C222K5RACTU-Kemet-datasheet-67847123.pdf?src-supplier=TME, ComponentLink27URL=https://datasheet.octopart.com:443/C0805C222K5RACTU-Kemet-datasheet-67847123.pdf?src-supplier=TME, ComponentLink28Description=https://datasheet.octopart.com:443/C0805C222K5RACTU-KEMET-datasheet-68331906.pdf?src-supplier=TME, ComponentLink28URL=https://datasheet.octopart.com:443/C0805C222K5RACTU-KEMET-datasheet-68331906.pdf?src-supplier=TME, ComponentLink29Description=https://datasheet.octopart.com:443/C0805C222K5RACTU-KEMET-datasheet-110724412.pdf?src-supplier=RS+(Formerly+Allied+Electronics), ComponentLink29URL=https://datasheet.octopart.com:443/C0805C222K5RACTU-KEMET-datasheet-110724412.pdf?src-supplier=RS+(Formerly+Allied+Electronics), ComponentLink30Description=https://datasheet.octopart.com:443/C0805C222K5RACTU-Kemet-datasheet-464.pdf?src-supplier=RS+(Formerly+Allied+Electronics), ComponentLink30URL=https://datasheet.octopart.com:443/C0805C222K5RACTU-Kemet-datasheet-464.pdf?src-supplier=RS+(Formerly+Allied+Electronics), ComponentLink31Description=https://datasheet.octopart.com/C0805C222K5RACTU-KEMET-datasheet-84169754.pdf, ComponentLink31URL=https://datasheet.octopart.com/C0805C222K5RACTU-KEMET-datasheet-84169754.pdf, ComponentLink32Description=https://datasheet.octopart.com:443/C0805C222K5RACTU-Kemet-datasheet-11791665.pdf?src-supplier=Arrow+Electronics, ComponentLink32URL=https://datasheet.octopart.com:443/C0805C222K5RACTU-Kemet-datasheet-11791665.pdf?src-supplier=Arrow+Electronics, ComponentLink33Description=https://datasheet.octopart.com:443/C0805C222K5RAC7800-KEMET-datasheet-164857143.pdf?src-supplier=Burklin+Elektronik, ComponentLink33URL=https://datasheet.octopart.com:443/C0805C222K5RAC7800-KEMET-datasheet-164857143.pdf?src-supplier=Burklin+Elektronik, ComponentLink34Description=http://sigma.octopart.com:80/conflict_mineral_statement/Yageo-company-3.pdf?src-supplier=Compliance+Statements, ComponentLink34URL=http://sigma.octopart.com:80/conflict_mineral_statement/Yageo-company-3.pdf?src-supplier=Compliance+Statements, ComponentLink35Description=http://sigma.octopart.com:80/rohs_statement/Yageo-company-2.pdf?src-supplier=Compliance+Statements, ComponentLink35URL=http://sigma.octopart.com:80/rohs_statement/Yageo-company-2.pdf?src-supplier=Compliance+Statements, Country of Origin=Mexico, Depth=1.25mm, Dissipation Factor=2.5%, Export Control Classification Number (ECCN) Code=EAR99, Harmonized Tariff Schedule (HTS) Code=8532.24.00.20, Height=780µm, Introduction Date=2008-01-10, Lead Free="Lead Free", Lead Pitch=750µm, Length=2mm, Lifecycle Status=Production, Manufacturer Part Number=C0805C222K5RACTU, Material=Ceramic, Mounting Technology="Surface Mount", Number of Terminals=2, Packaging="Cut Tape", Pins=2, Pricing="1=0.1, 10=0.055, 50=0.037, 100=0.0318, 500=0.02296 (USD)", Radiation Hardening=No, REACH SVHC=Unaffected, RoHS=Compliant, Schedule B="8532240020, 8532240020|8532240020, 8532240020|8532240020|8532240020, 8532240020|8532240020|8532240020|8532240020", Stock=238598, Supplier=DigiKey, Termination=SMD/SMT, Thickness=889µm, Voltage Rating=50V, Voltage Rating (AC)=50V, Voltage Rating (DC)=50V, Width=1.25mm
C4: library part GRM21BR72A474KA73L, "CAP CER 0.47UF 100V X7R 0805", Case Code (Imperial)=0805, Case Code (Metric)=2012, Dielectric=X7R, Dielectric Material=Ceramic, Manufacturer=Murata, Manufacturer Lifecycle Status="IN PRODUCTION", Max Operating Temperature=125°C, Min Operating Temperature=-55°C, Supplier Part Number=490-3326-1-ND, Tolerance=10%, Voltage=100V, Case/Package=0805, Category="Ceramic Capacitors", ComponentLink1Description=https://datasheet.octopart.com:443/GRM21BR72A474KA73L-Murata-datasheet-66077118.pdf?src-supplier=element14+APAC, ComponentLink1URL=https://datasheet.octopart.com:443/GRM21BR72A474KA73L-Murata-datasheet-66077118.pdf?src-supplier=element14+APAC, ComponentLink2Description=https://datasheet.octopart.com:443/GRM21BR72A474KA73L-Murata-datasheet-595945.pdf?src-supplier=_legacy+Avnet, ComponentLink2URL=https://datasheet.octopart.com:443/GRM21BR72A474KA73L-Murata-datasheet-595945.pdf?src-supplier=_legacy+Avnet, ComponentLink3Description=https://datasheet.octopart.com:443/GRM21BR72A474KA73L-Murata-datasheet-165579666.pdf?src-supplier=TME, ComponentLink3URL=https://datasheet.octopart.com:443/GRM21BR72A474KA73L-Murata-datasheet-165579666.pdf?src-supplier=TME, ComponentLink4Description=https://datasheet.octopart.com:443/GRM21BR72A474KA73L-Murata-datasheet-59876780.pdf?src-supplier=TME, ComponentLink4URL=https://datasheet.octopart.com:443/GRM21BR72A474KA73L-Murata-datasheet-59876780.pdf?src-supplier=TME, ComponentLink5Description=https://datasheet.octopart.com:443/GRM21BR72A474KA73L-Murata-datasheet-140707811.pdf?src-supplier=Ciiva, ComponentLink5URL=https://datasheet.octopart.com:443/GRM21BR72A474KA73L-Murata-datasheet-140707811.pdf?src-supplier=Ciiva, ComponentLink6Description=https://datasheet.octopart.com:443/GRM21BR72A474KA73L-Murata-datasheet-138745109.pdf?src-supplier=Ciiva, ComponentLink6URL=https://datasheet.octopart.com:443/GRM21BR72A474KA73L-Murata-datasheet-138745109.pdf?src-supplier=Ciiva, ComponentLink7Description=https://datasheet.octopart.com:443/GRM21BR72A474KA73L-Murata-datasheet-22122223.pdf?src-supplier=Future+Electronics, ComponentLink7URL=https://datasheet.octopart.com:443/GRM21BR72A474KA73L-Murata-datasheet-22122223.pdf?src-supplier=Future+Electronics, ComponentLink8Description=https://datasheet.octopart.com:443/GRM21BR72A474KA73L-Murata-datasheet-14397553.pdf?src-supplier=Future+Electronics, ComponentLink8URL=https://datasheet.octopart.com:443/GRM21BR72A474KA73L-Murata-datasheet-14397553.pdf?src-supplier=Future+Electronics, ComponentLink9Description=https://datasheet.octopart.com:443/GRM21BR72A474KA73L-Murata-datasheet-44108957.pdf?src-supplier=Future+Electronics, ComponentLink9URL=https://datasheet.octopart.com:443/GRM21BR72A474KA73L-Murata-datasheet-44108957.pdf?src-supplier=Future+Electronics, ComponentLink10Description=https://datasheet.octopart.com/GRM21BR72A474KA73L-Murata-datasheet-12515295.pdf, ComponentLink10URL=https://datasheet.octopart.com/GRM21BR72A474KA73L-Murata-datasheet-12515295.pdf, ComponentLink11Description=https://datasheet.octopart.com/GRM21BR72A474KA73L-Murata-datasheet-12510076.pdf, ComponentLink11URL=https://datasheet.octopart.com/GRM21BR72A474KA73L-Murata-datasheet-12510076.pdf, ComponentLink12Description=https://datasheet.octopart.com/GRM21BR72A474KA73L-Murata-datasheet-11978611.pdf, ComponentLink12URL=https://datasheet.octopart.com/GRM21BR72A474KA73L-Murata-datasheet-11978611.pdf, ComponentLink13Description=https://datasheet.octopart.com/GRM21BR72A474KA73L-Murata-datasheet-10025737.pdf, ComponentLink13URL=https://datasheet.octopart.com/GRM21BR72A474KA73L-Murata-datasheet-10025737.pdf, ComponentLink14Description=https://datasheet.octopart.com/GRM21BR72A474KA73L-Murata-datasheet-8819587.pdf, ComponentLink14URL=https://datasheet.octopart.com/GRM21BR72A474KA73L-Murata-datasheet-8819587.pdf, ComponentLink15Description=https://datasheet.octopart.com/GRM21BR72A474KA73L-Murata-datasheet-14397549.pdf, ComponentLink15URL=https://datasheet.octopart.com/GRM21BR72A474KA73L-Murata-datasheet-14397549.pdf, ComponentLink16Description=https://datasheet.octopart.com:443/GRM21BR72A474KA73L-Murata-datasheet-12510170.pdf?src-supplier=Factory+Futures, ComponentLink16URL=https://datasheet.octopart.com:443/GRM21BR72A474KA73L-Murata-datasheet-12510170.pdf?src-supplier=Factory+Futures, ComponentLink17Description=https://datasheet.octopart.com:443/GRM21BR72A474KA73L-Murata-datasheet-8517407.pdf?src-supplier=Factory+Futures, ComponentLink17URL=https://datasheet.octopart.com:443/GRM21BR72A474KA73L-Murata-datasheet-8517407.pdf?src-supplier=Factory+Futures, ComponentLink18Description=https://datasheet.octopart.com:443/GRM21BR72A474KA73L-Murata-datasheet-8387045.pdf?src-supplier=Factory+Futures, ComponentLink18URL=https://datasheet.octopart.com:443/GRM21BR72A474KA73L-Murata-datasheet-8387045.pdf?src-supplier=Factory+Futures, ComponentLink19Description=https://datasheet.octopart.com:443/GRM21BR72A474KA73L-Murata-datasheet-8324201.pdf?src-supplier=Factory+Futures, ComponentLink19URL=https://datasheet.octopart.com:443/GRM21BR72A474KA73L-Murata-datasheet-8324201.pdf?src-supplier=Factory+Futures, ComponentLink20Description=https://datasheet.octopart.com:443/GRM21BR72A474KA73L-Murata-datasheet-7628724.pdf?src-supplier=Factory+Futures, ComponentLink20URL=https://datasheet.octopart.com:443/GRM21BR72A474KA73L-Murata-datasheet-7628724.pdf?src-supplier=Factory+Futures, ComponentLink21Description=https://datasheet.octopart.com:443/GRM21BR72A474KA73L-Murata-datasheet-552801.pdf?src-supplier=Factory+Futures, ComponentLink21URL=https://datasheet.octopart.com:443/GRM21BR72A474KA73L-Murata-datasheet-552801.pdf?src-supplier=Factory+Futures, ComponentLink22Description=https://datasheet.octopart.com:443/GRM21BR72A474KA73L-Murata-datasheet-11861205.pdf?src-supplier=Arrow+Electronics, ComponentLink22URL=https://datasheet.octopart.com:443/GRM21BR72A474KA73L-Murata-datasheet-11861205.pdf?src-supplier=Arrow+Electronics, ComponentLink23Description=https://datasheet.octopart.com:443/GRM21BR72A474KA73L-Murata-datasheet-118811.pdf?src-supplier=DigiKey, ComponentLink23URL=https://datasheet.octopart.com:443/GRM21BR72A474KA73L-Murata-datasheet-118811.pdf?src-supplier=DigiKey, ComponentLink24Description=http://sigma.octopart.com:80/reach_statement/Murata-company-16.pdf?src-supplier=Compliance+Statements, ComponentLink24URL=http://sigma.octopart.com:80/reach_statement/Murata-company-16.pdf?src-supplier=Compliance+Statements, Country of Origin="Japan, Mainland China, Philippines, Singapore, Thailand", Depth=1.25mm, Export Control Classification Number (ECCN) Code=EAR99, Harmonized Tariff Schedule (HTS) Code=8532.24.00.20, Height=1.25mm, Introduction Date=2006-11-17, Lead Free="Lead Free", Length=2mm, Lifecycle Status=Production, Manufacturer Part Number=GRM21BR72A474KA73L, Material=Ceramic, Mounting Technology="Surface Mount", Number of Terminals=2, Packaging="Cut Tape", Pricing="1=0.4, 10=0.241, 50=0.1776, 100=0.1582, 500=0.1253 (USD)", Radiation Hardening=No, REACH SVHC=Unaffected, RoHS=Compliant, Schedule B="8532240020, 8532240020|8532240020, 8532240020|8532240020|8532240020, 8532240020|8532240020|8532240020|8532240020", Stock=1382, Supplier=DigiKey, Termination=SMD/SMT, Thickness=1.25mm, Voltage Rating=100V, Voltage Rating (DC)=100V, Width=1.25mm
C5 C8 C9 C10: library part C0805C102K5RACTU, "Multilayer Ceramic Capacitors MLCC - SMD/SMT 50V 1000pF X7R 0805 10%", Package="805-2 KEMET", Check_prices=https://www.snapeda.com/parts/C0805C102K5RAC%20TU/Kemet/view-part/?ref=eda, MF=KEMET, MP="C0805C102K5RAC TU", SnapEDA_Link=https://www.snapeda.com/parts/C0805C102K5RAC%20TU/Kemet/view-part/?ref=snap
C6 C7: library part C0805C222K5RACTU, "Capacitor, Ceramic, Cap, 2200pF, Tol 10%, SMT, 50V, X7R", Package="805-2 KEMET", Check_prices=https://www.snapeda.com/parts/C0805C222K5RACTU/KEMET/view-part/?ref=eda, MF=KEMET, MP=C0805C222K5RACTU, SnapEDA_Link=https://www.snapeda.com/parts/C0805C222K5RACTU/KEMET/view-part/?ref=snap
C11: library part CL21B106KOQNNNE, "16V 10uF X7R 卤10% 0805 Multilayer Ceramic Capacitors MLCC - SMD/SMT ROHS", Case Code (Imperial)=0805, Case Code (Metric)=2012, Dielectric=X7R, Dielectric Material=Ceramic, Manufacturer="Samsung Electro-Mechanics", Max Operating Temperature=125°C, Min Operating Temperature=-55°C, Supplier Part Number=1276-2872-6-ND, Tolerance=10%, Voltage=16V, Case/Package=0805, Category="Ceramic Capacitors", China RoHS=Compliant, ComponentLink1Description=https://datasheet.octopart.com:443/CL21B106KOQNNNE-Samsung-Electro-Mechanics-datasheet-136482503.pdf?src-supplier=IHS, ComponentLink1URL=https://datasheet.octopart.com:443/CL21B106KOQNNNE-Samsung-Electro-Mechanics-datasheet-136482503.pdf?src-supplier=IHS, ComponentLink2Description=https://datasheet.octopart.com:443/CL21B106KOQNNNE-Samsung-Electro-Mechanics-datasheet-116891046.pdf?src-supplier=Future+Electronics, ComponentLink2URL=https://datasheet.octopart.com:443/CL21B106KOQNNNE-Samsung-Electro-Mechanics-datasheet-116891046.pdf?src-supplier=Future+Electronics, ComponentLink3Description=https://datasheet.octopart.com:443/CL21B106KOQNNNE-Samsung-Electro-Mechanics-datasheet-81462191.pdf?src-supplier=Future+Electronics, ComponentLink3URL=https://datasheet.octopart.com:443/CL21B106KOQNNNE-Samsung-Electro-Mechanics-datasheet-81462191.pdf?src-supplier=Future+Electronics, ComponentLink4Description=https://datasheet.octopart.com:443/CL21B106KOQNNNE-Samsung-datasheet-12530662.pdf?src-supplier=Future+Electronics, ComponentLink4URL=https://datasheet.octopart.com:443/CL21B106KOQNNNE-Samsung-datasheet-12530662.pdf?src-supplier=Future+Electronics, ComponentLink5Description=https://datasheet.octopart.com:443/CL21B106KOQNNNE-Samsung-datasheet-26669285.pdf?src-supplier=Future+Electronics, ComponentLink5URL=https://datasheet.octopart.com:443/CL21B106KOQNNNE-Samsung-datasheet-26669285.pdf?src-supplier=Future+Electronics, ComponentLink6Description=https://datasheet.octopart.com:443/CL21B106KOQNNNE-Samsung-Electro-Mechanics-datasheet-149045986.pdf?src-supplier=Future+Electronics, ComponentLink6URL=https://datasheet.octopart.com:443/CL21B106KOQNNNE-Samsung-Electro-Mechanics-datasheet-149045986.pdf?src-supplier=Future+Electronics, ComponentLink7Description=https://datasheet.octopart.com/CL21B106KOQNNNE-Samsung-Electro-Mechanics-datasheet-97040617.pdf, ComponentLink7URL=https://datasheet.octopart.com/CL21B106KOQNNNE-Samsung-Electro-Mechanics-datasheet-97040617.pdf, ComponentLink8Description=https://datasheet.octopart.com/CL21B106KOQNNNE-Samsung-Electro-Mechanics-datasheet-8324245.pdf, ComponentLink8URL=https://datasheet.octopart.com/CL21B106KOQNNNE-Samsung-Electro-Mechanics-datasheet-8324245.pdf, ComponentLink9Description=https://datasheet.octopart.com:443/CL21B106KOQNNNE-Samsung-Electro-Mechanics-datasheet-11806859.pdf?src-supplier=Arrow+Electronics, ComponentLink9URL=https://datasheet.octopart.com:443/CL21B106KOQNNNE-Samsung-Electro-Mechanics-datasheet-11806859.pdf?src-supplier=Arrow+Electronics, ComponentLink10Description=https://datasheet.octopart.com:443/CL21B106KOQNNNE-Samsung-datasheet-8326407.pdf?src-supplier=TME, ComponentLink10URL=https://datasheet.octopart.com:443/CL21B106KOQNNNE-Samsung-datasheet-8326407.pdf?src-supplier=TME, Contact Plating=Tin, Country of Origin="Mainland China, Philippines, South Korea", Depth=1.25mm, Export Control Classification Number (ECCN) Code=EAR99, Harmonized Tariff Schedule (HTS) Code=8532.24.00.20, Height=1.4mm, Introduction Date=2010-04-09, Length=2mm, Lifecycle Status=Production, Manufacturer Part Number=CL21B106KOQNNNE, Material=Ceramic, Mounting Technology="Surface Mount", Number of Terminals=2, Pricing="1=0.28, 10=0.165, 50=0.1194, 100=0.1053, 500=0.08152 (USD)", Radiation Hardening=No, REACH SVHC=Unaffected, RoHS=Compliant, Schedule B="8532240020, 8532240020|8532240020, 8532240020|8532240020|8532240020, 8532240020|8532240020|8532240020|8532240020", Stock=5268, Supplier=DigiKey, Thickness=1.397mm, Voltage Rating=16V, Voltage Rating (DC)=16V, Width=1.25mm
J1: library part SLW-101-01-T-S, "CONN RCPT 1POS TIN PCB", Color=Black, Manufacturer=Samtec, Manufacturer Lifecycle Status=PRODUCTION, Supplier Part Number=612-SLW-101-01-T-S-ND, Category="Board to Board Connectors", ComponentLink1Description=https://datasheet.octopart.com:443/SLW-101-01-T-S-Samtec-datasheet-97281374.pdf?src-supplier=Samtec, ComponentLink1URL=https://datasheet.octopart.com:443/SLW-101-01-T-S-Samtec-datasheet-97281374.pdf?src-supplier=Samtec, ComponentLink2Description=https://sigma.octopart.com:443/97281375/technical_drawing/Samtec-SLW-101-01-T-S.pdf?src-supplier=JRH+Electronics, ComponentLink2URL=https://sigma.octopart.com:443/97281375/technical_drawing/Samtec-SLW-101-01-T-S.pdf?src-supplier=JRH+Electronics, ComponentLink3Description=https://datasheet.octopart.com:443/SLW-101-01-T-S-Samtec-datasheet-195786494.pdf?src-supplier=Toby+Electronics, ComponentLink3URL=https://datasheet.octopart.com:443/SLW-101-01-T-S-Samtec-datasheet-195786494.pdf?src-supplier=Toby+Electronics, ComponentLink4Description=https://datasheet.octopart.com:443/SLW-101-01-T-S-Samtec-datasheet-136395473.pdf?src-supplier=Toby+Electronics, ComponentLink4URL=https://datasheet.octopart.com:443/SLW-101-01-T-S-Samtec-datasheet-136395473.pdf?src-supplier=Toby+Electronics, ComponentLink5Description=https://datasheet.octopart.com:443/SLW-101-01-T-S-Samtec-datasheet-118235307.pdf?src-supplier=Sager+Electronics, ComponentLink5URL=https://datasheet.octopart.com:443/SLW-101-01-T-S-Samtec-datasheet-118235307.pdf?src-supplier=Sager+Electronics, ComponentLink6Description=https://datasheet.octopart.com:443/SLW-101-01-T-S-Samtec-datasheet-86818374.pdf?src-supplier=Sager+Electronics, ComponentLink6URL=https://datasheet.octopart.com:443/SLW-101-01-T-S-Samtec-datasheet-86818374.pdf?src-supplier=Sager+Electronics, ComponentLink7Description=https://datasheet.octopart.com:443/SLW-101-01-T-S-Samtec-datasheet-41643084.pdf?src-supplier=element14+APAC, ComponentLink7URL=https://datasheet.octopart.com:443/SLW-101-01-T-S-Samtec-datasheet-41643084.pdf?src-supplier=element14+APAC, ComponentLink8Description=https://datasheet.octopart.com:443/SLW-101-01-T-S-Samtec-datasheet-151455179.pdf?src-supplier=Newark, ComponentLink8URL=https://datasheet.octopart.com:443/SLW-101-01-T-S-Samtec-datasheet-151455179.pdf?src-supplier=Newark, ComponentLink9Description=https://datasheet.octopart.com:443/SLW-101-01-T-S-Samtec-datasheet-21214624.pdf?src-supplier=Newark, ComponentLink9URL=https://datasheet.octopart.com:443/SLW-101-01-T-S-Samtec-datasheet-21214624.pdf?src-supplier=Newark, ComponentLink10Description=https://datasheet.octopart.com:443/SLW-101-01-T-S-Samtec-datasheet-140570640.pdf?src-supplier=Arrow.cn, ComponentLink10URL=https://datasheet.octopart.com:443/SLW-101-01-T-S-Samtec-datasheet-140570640.pdf?src-supplier=Arrow.cn, ComponentLink11Description=https://datasheet.octopart.com:443/SLW-101-01-T-S-Samtec-datasheet-13696199.pdf?src-supplier=_legacy+Avnet, ComponentLink11URL=https://datasheet.octopart.com:443/SLW-101-01-T-S-Samtec-datasheet-13696199.pdf?src-supplier=_legacy+Avnet, Connector Type=Receptacle, Contact Material=Bronze, Contact Plating=Tin, Gender=Receptacle, Height=4.57mm, Housing Color=Black, Housing Material=Plastic, Lead Free="Lead Free", Length=2.54mm, Lifecycle Status=Production, Manufacturer Part Number=SLW-101-01-T-S, Mounting Technology="Through Hole", Number of Contacts=1, Number of Positions=1, Number of Rows=1, Orientation=Straight, Packaging=Bulk, Pins=1, Pricing="1=0.16, 10=0.14, 100=0.119, 500=0.1062, 1000=0.10112, 5000=0.09025, 10000=0.08594 (USD)", Radiation Hardening=No, REACH SVHC=Unaffected, RoHS=Compliant, Schedule B="8536694040, 8536694040|8536694040|8536694040|8536694040|8536694040", Stock=1465, Supplier=DigiKey, Termination=Solder, Width=2.54mm
J2 J3 J4 J5 J6: library part SLW-101-01-T-S, Package=None, Availability=Unavailable, MP=SLW-101-01-T-S, Price=None